# Altium PCB personal_trng_single_sided.PcbDoc
Units mm, origin at the board's own origin, x right, y up, seen from the top; angles counter-clockwise.
Board outline 64 x 84 mm, 2 copper layers (Top Layer, Bottom Layer); 33 components, 38 nets, 138 pads, 0 vias.
Unrouted connection lines stored in the file: 5.
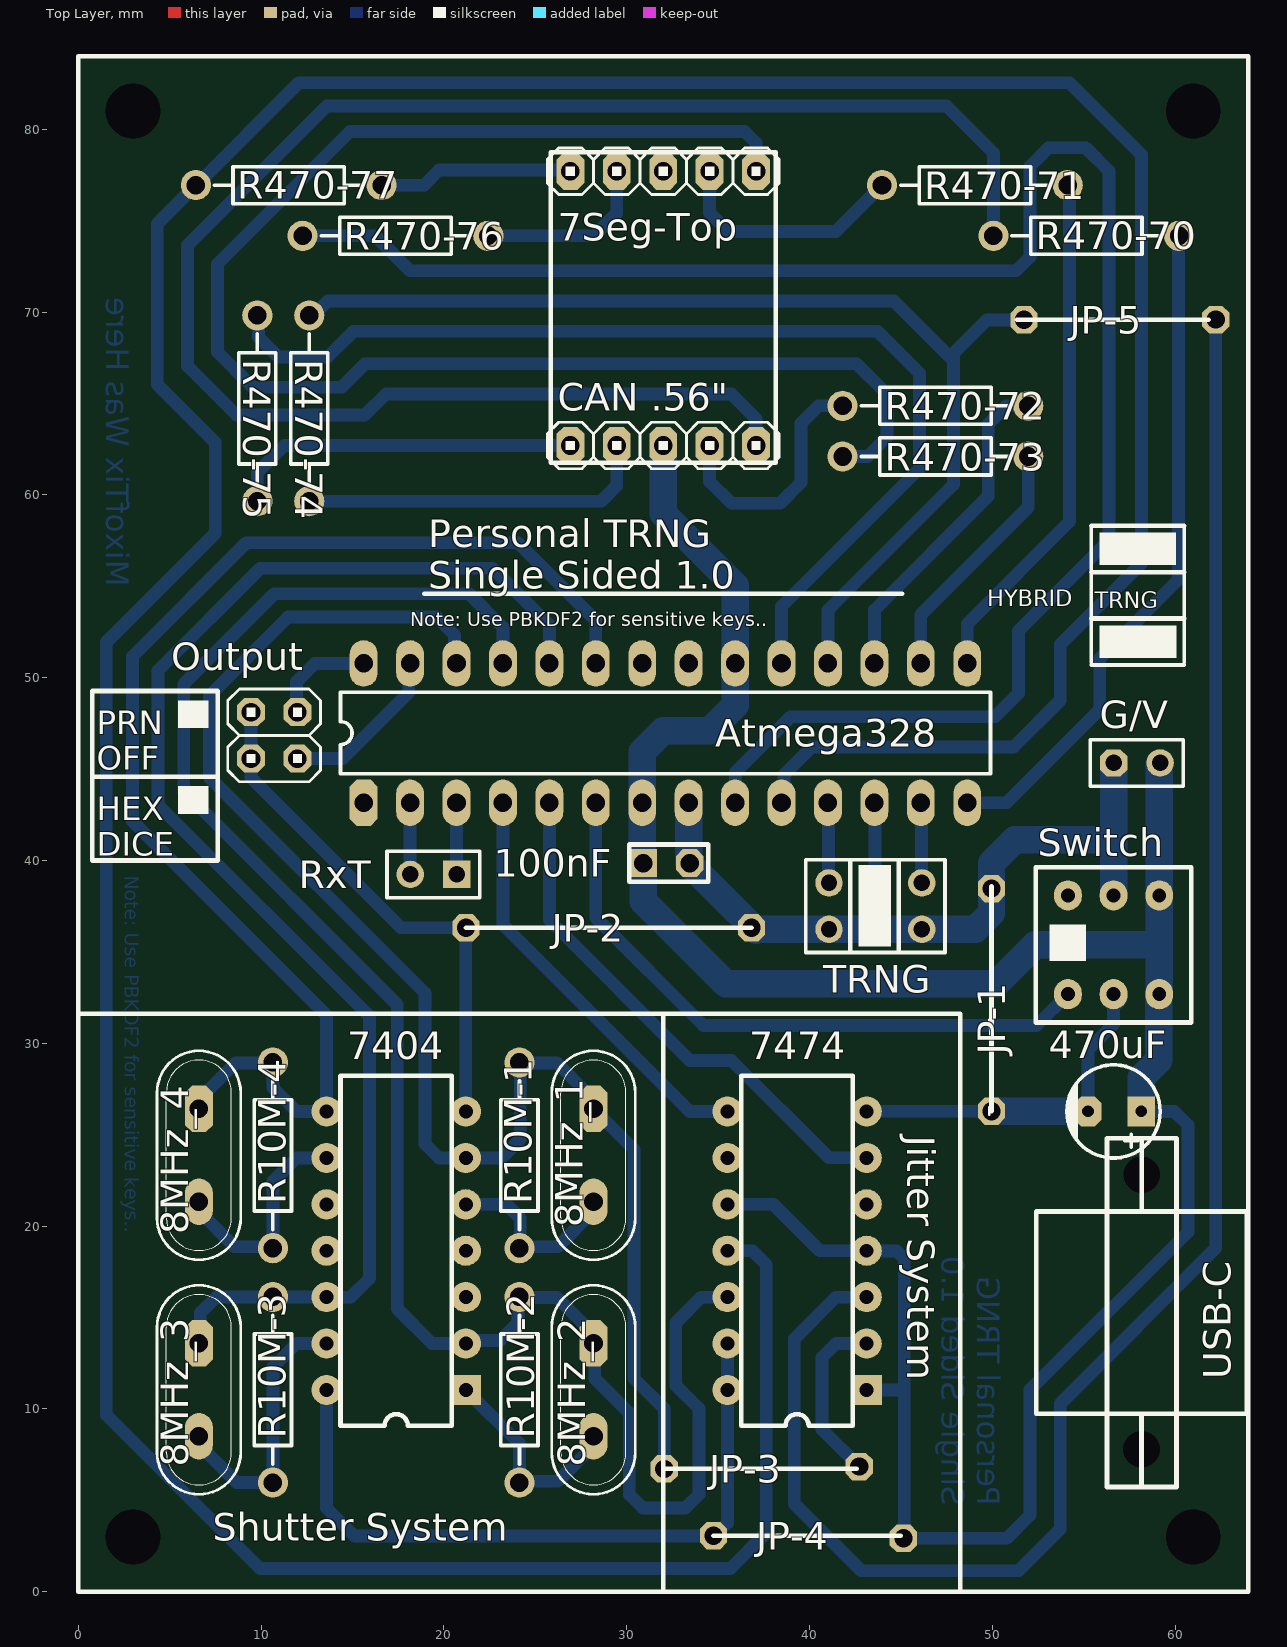
[diagram p0: Top Layer view]
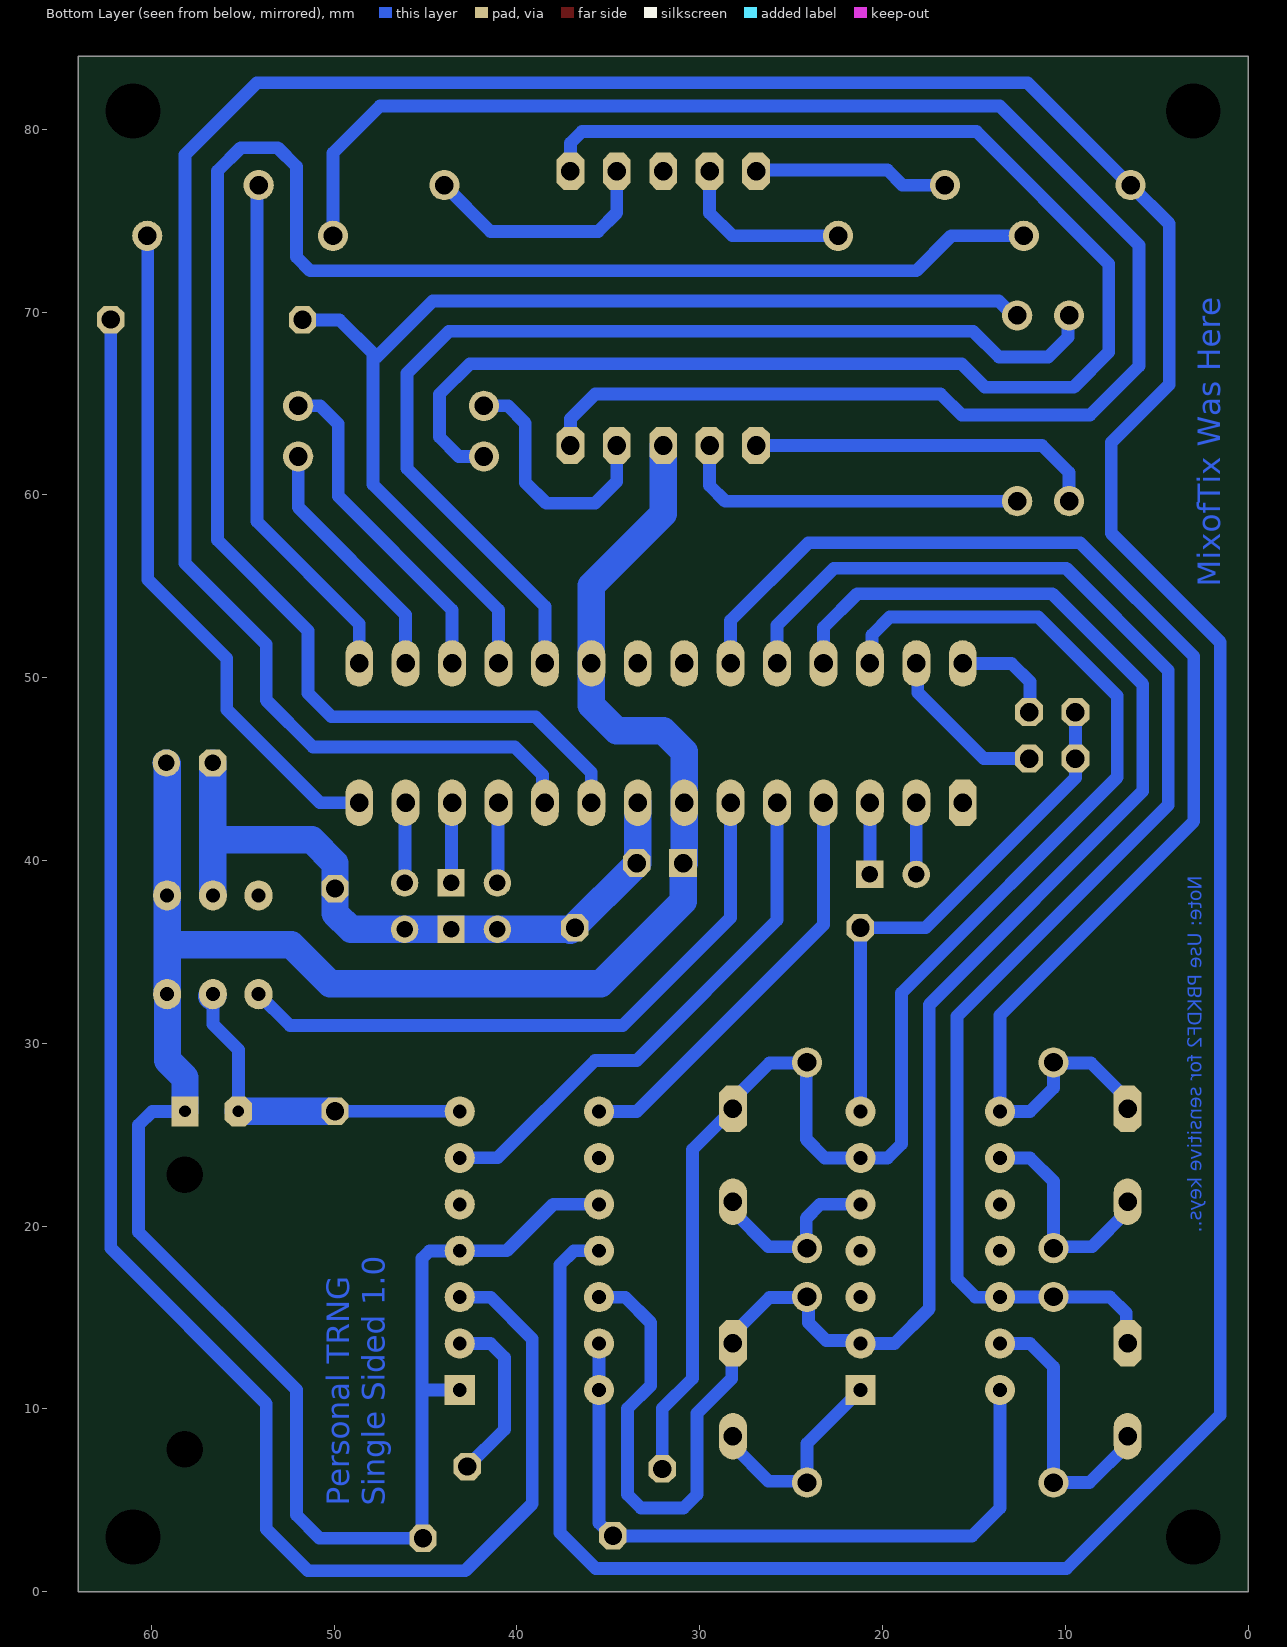
[diagram p1: Bottom Layer view, seen from below]

## Layer stack, top to bottom
Top Solder: solder mask 0.0102, Solder Resist, Dk 3.5
Top Layer: signal copper 0.0356
Dielectric 1: dielectric 0.32, FR-4, Dk 4.8
Bottom Layer: signal copper 0.0356
Bottom Solder: solder mask 0.0102, Solder Resist, Dk 3.5

## Board outline
0,0 64,0 64,84 0,84

## Design rules (kind name [scope] priority, off if disabled: settings)
Clearance [All] p1: gap=0.254 ignorepadtopadclearanceinfootprint=FALSE except(0: Arc-Hole Track-Hole SMDPad-Hole THPad-Hole Via-Hole Fill-Hole Poly-Hole Region-Hole Text-Hole)
PolygonConnect [All] p1: connectstyle=Relief reliefconductorwidth=0.254 reliefentries=4 polygonreliefangle="90 Angle" airgapwidth=0.254
RoutingVias [All] p1: holewidth=0.711 width=1.27 viastyle="Through Hole" minholewidth=0.711 minwidth=1.27 maxholewidth=0.711 maxwidth=1.27
SolderMaskExpansion [All] p1: expansion=0.102 istentingtop=FALSE
Width [All] p1: maxlimit=1.5 minlimit=0.5 preferedwidth=0.7
30 further rules are at their usual default settings.

## Components (designator, comment, footprint, x,y, rotation, side; value= is the part's Value field where it differs from the comment)
7Seg-Top "Header 5" My_1X05 32,77.709 r180 top
8MHz_1 "CRYSTAL" My_Crystal 28.185,23.874 r270 top
8MHz_2 "CRYSTAL" My_Crystal 28.185,11.047 r270 top
8MHz_3 "CRYSTAL" My_Crystal 6.595,11.047 r270 top
8MHz_4 "CRYSTAL" My_Crystal 6.595,23.874 r270 top
100nF "Cap" My_cap100n 32.179,39.863 r180 top value=100nF
470uF "Cap" "cap 01" 56.639,26.274 r0 top
7404 "NOT-Gate" dip14 17.39,18.654 r180 top
7474 "Flip-Flop" dip14 39.323,18.654 r180 top
Atmega328 "ATmega328P" My_28P3 32.122,46.975 r0 top
"CAN .56\"" "Header 5" My_1X05 32,62.709 r180 top
G/V "Header 2" HDR1X2#1 56.642,45.339 r0 top
JP-1 "Jumper" Jumper#1 49.832,28.687 r270 top
JP-2 "Jumper" Jumper#2 29.464,36.322 r180 top
JP-3 "Jumper" Jumper#3 38.021,6.716 r180 top
JP-4 "Jumper" Jumper#4 32.004,3.048 r0 top
JP-5 "Jumper" Jumper#5 57.452,69.581 r180 top
Output "Header 2X2" My_2X02 10.716,46.848 r90 top
R10M-1 "1k" My_axial-0.4 24.146,23.861 r270 top value=Resistor
R10M-2 "1k" My_axial-0.4 24.146,11.034 r270 top value=Resistor
R10M-3 "1k" My_axial-0.4 10.659,11.034 r270 top value=Resistor
R10M-4 "1k" My_axial-0.4 10.659,23.861 r270 top value=Resistor
R470-70 "220" My_axial-0.4 55.16,74.192 r0 top value=Resistor
R470-71 "220" My_axial-0.4 49.064,76.964 r0 top value=Resistor
R470-72 "220" My_axial-0.4 46.905,64.89 r0 top value=Resistor
R470-73 "220" My_axial-0.4 46.905,62.12 r0 top value=Resistor
R470-74 "220" My_axial-0.4 12.621,64.755 r90 top value=Resistor
R470-75 "220" My_axial-0.4 9.781,64.755 r90 top value=Resistor
R470-76 "220" My_axial-0.4 17.339,74.167 r180 top value=Resistor
R470-77 "220" My_axial-0.4 11.497,76.939 r180 top value=Resistor
RxT "Header 2" HDR1X2#2 20.701,39.243 r180 top
Switch "Double Switch" "Switch - DPDT" 56.639,35.389 r90 top
TRNG "Header 3X2" HDR2X3 46.149,38.777 r180 top

## Footprints (in the part's own frame and the unit in brackets; to place one, negate y for a bottom-side part, rotate by r counter-clockwise, add the part's x,y. Pads: shape width x height; smd on the part's side, far side on the other; paste and mask are expansions set on the pad)
"cap 01" [mil]
  rect 59.06x65 hole 25: 1(60,0)
  oct 59.06x65 hole 25: 2(-55,0)
  silkscreen extent -100,-100 100,100, body extent -99,-99 99,99, height 494
dip14 [mil]
  rect 65x65 hole 30: 1(-150,300)
  round 65 hole 30: 2(-150,200) 3(-150,100) 4(-150,0) 5(-150,-100) 6(-150,-200) 7(-150,-300) 8(150,-300) 9(150,-200) 10(150,-100) 11(150,0) 12(150,100) 13(150,200) 14(150,300)
  silkscreen extent -120,-377 120,377, body extent -155,-384 155,384, height 200
HDR1X2#1 [mm] "Connector; Header; 2 Position"
  oct 1.5x1.5 hole 0.9: 1(0,0)
  round 1.5 hole 0.9: 2(2.54,0)
  silkscreen extent -1.27,-1.27 3.81,1.27
HDR1X2#2 [mm] "Connector; Header; 2 Position"
  rect 1.5x1.5 hole 0.9: 1(0,0)
  round 1.5 hole 0.9: 2(2.54,0)
  silkscreen extent -1.27,-1.27 3.81,1.27
HDR2X3 [mm] "Connector; Header; 3x2 Position"
  round 1.5 hole 0.9: 1(0,0) 2(0,2.54) 5(5.08,0) 6(5.08,2.54)
  rect 1.5x1.5 hole 0.9: 3(2.54,0) 4(2.54,2.54)
  silkscreen extent -1.27,-1.27 6.35,3.81
Jumper#1 [mm]
  oct 1.5x1.5 hole 1: 1(-9.779,0.127) 2(2.398,0.127)
  silkscreen extent -2.6,0 2.6,0, body extent -7.26,-1.14 1.16,1.26, height 2.5
Jumper#2 [mm]
  oct 1.5x1.5 hole 1: 1(-7.366,0) 2(8.255,0)
  silkscreen extent -2.6,0 2.6,0, body extent -4.21,-1.2 4.21,1.2, height 2.5
Jumper#3 [mm]
  oct 1.5x1.5 hole 1: 1(-4.699,-0.127) 2(5.969,0)
  body extent -3.53,-1.27 4.89,1.13, height 2.5
Jumper#4 [mm]
  oct 1.5x1.5 hole 1: 1(2.746,0.015) 2(13.138,-0.127)
  body extent 3.79,-1.14 12.21,1.26, height 2.5
Jumper#5 [mm]
  oct 1.5x1.5 hole 1: 1(-4.778,-0.015) 2(5.715,0)
  silkscreen extent -2.6,0 2.6,0, body extent -3.67,-1.15 4.75,1.25, height 2.5
My_1X05 [mil]
  oct 60x80 hole 40: 1(-200,0) 2(-100,0) 3(0,0) 4(100,0) 5(200,0)
  silkscreen extent -250,-50 250,50
My_2X02 [mil]
  oct 60x60 hole 40: 1(-50,-50) 2(-50,50) 3(50,-50) 4(50,50)
  silkscreen extent -100,-100 100,100
My_28P3 [mil]
  oct 60x100 hole 40: 1(-650,-150)
  oval 60x100 hole 40: 2(-550,-150) 3(-450,-150) 4(-350,-150) 5(-250,-150) 6(-150,-150) 7(-50,-150) 8(50,-150) 9(150,-150) 10(250,-150) 11(350,-150) 12(450,-150) 13(550,-150) 14(650,-150) 15(650,150) 16(550,150) 17(450,150) 18(350,150) 19(250,150) 20(150,150) 21(50,150) 22(-50,150) 23(-150,150) 24(-250,150) 25(-350,150) 26(-450,150) 27(-550,150) 28(-650,150)
  silkscreen extent -700,-88 700,88
My_axial-0.4 [mil]
  round 65 hole 40: 1(-200.5,-0.5) 2(199.5,-0.5)
  silkscreen extent -160,-41 160,40
My_cap100n [mil]
  oct 60x60 hole 40: 1(-50,0)
  rect 60x60 hole 40: 2(50,0)
  silkscreen extent -90,-40 80,40
My_Crystal [mil]
  oct 100x60 hole 40: 1(-100,0)
  oval 100x60 hole 40: 2(100,0)
  silkscreen extent -225,-90 225,90
"Switch - DPDT" [mil]
  oval 65x60 hole 30: 1(-106.3,98.43) 2(-106.3,0) 3(-106.3,-98.43) 4(106.3,-98.43) 5(106.3,0) 6(106.3,98.43)
  silkscreen extent -167,-167 167,167, body extent -167,-167 167,167, height 559

## Part data
7Seg-Top "CAN .56\"": "Header, 5-Pin", LatestRevisionDate=17-Jul-2002, LatestRevisionNote="Re-released for DXP Platform.", Publisher="Altium Limited"
8MHz_1 8MHz_2 8MHz_3 8MHz_4: "Crystal"
100nF: library part "Cap ceramic", "CAP-100Nf"
470uF: library part Cap-Polar, "Polar Capacitor", Adding Date=1387/12/20, Designer="Saeid Jorablo", Organazation=ControTec
7404: library part SN7404, "Hex Inverter", Manufactorer="Texas Instrument", Adding Date=1387/12/22, Company=ControTec, ComponentLink1Description="Data Sheet", Designer="Saeid Jorablo"
7474: library part SN7474N, "Dual D Flip Flop", Manufactorer="Texas Instrument", Adding Date=1387/12/22, Company=ControTec, ComponentLink1Description="Data Sheet", Designer="Saeid Jorablo"
Atmega328: library part ATmega8-16PI, "AVR 8K Bytes of In-System Programmable Flash Memory", ComponentLink1Description="Manufacturer Link", ComponentLink1URL=http://www.atmel.com, ComponentLink2Description=Datasheet, ComponentLink2URL=http://www.atmel.com/dyn/resources/prod_documents/doc2486.pdf, DatasheetVersion=2486H-AVR-09/02, LatestRevisionDate=04-Mar-2005, LatestRevisionNote="Stylized 3D Model Added.", PackageDescription="DIP; 28 Leads; Row Spacing 7.62 mm; Pitch 2.54 mm", PackageReference=28P3, PackageVersion="revB, Sep-2001", Published=17-Sep-2003, Publisher="Altium Limited"
G/V RxT: "Header, 2-Pin", LatestRevisionDate=17-Jul-2002, LatestRevisionNote="Re-released for DXP Platform.", Publisher="Altium Limited"
Output: "Header, 2-Pin, Dual row", LatestRevisionDate=17-Jul-2002, LatestRevisionNote="Re-released for DXP Platform.", Publisher="Altium Limited"
R10M-1 R10M-2 R10M-3 R10M-4 R470-70 R470-71 R470-72 R470-73 R470-74 R470-75 R470-76 R470-77: library part Res, "resistor 1/4 wat"
Switch: library part "Switch - DPDT", "DPDT Switch"
TRNG: "Header, 3-Pin, Dual row", LatestRevisionDate=17-Jul-2002, LatestRevisionNote="Re-released for DXP Platform.", Publisher="Altium Limited"
JP-1 JP-2 JP-3 JP-4 JP-5: Company=E.P.I.L, Defualt State=Close, Design Date=2011/11/02

## Free pads (board coordinates)
  round 1.524 hole 3: 3(3,3) 3(3,81) 3(61,3) 3(61,81)
  round 1.524 hole 2: 4(58.166,7.801) 4(58.183,22.801)

## Nets (pads, with @x,y where several pads share a name; then routed paths per layer and width w, separated by ;. In a path a pad name is that pad's centre, name@x,y a point inside that pad or via, vN(x,y) a via of type N, cw(c..) or ccw(c..) an arc to the next point about the centre after c; other vN are vias at no path point)
GND: 100nF.1 470uF.2 7404.7 7474.7 Atmega328.8 G/V.1 JP-1.1 JP-1.2 JP-2.1 JP-2.2 Output.2 Output.4 Switch.2 Switch.5 TRNG.2 TRNG.4 TRNG.6 | length 87.2
  Bottom Layer w0.7: Output.4 Output.2 ; Output.2@9.535,45.489 Output.2 ; 7404.7 JP-2.2@21.2,36.322 ; JP-2.2 JP-2.2@21.2,36.322 ; JP-2.1@37.075,36.185 JP-2.1@37.127,36.237 ; 7474.7 43.14,26.281 49.951,26.281 JP-1.2 ; 470uF.2@55.293,26.325 470uF.2 55.242,26.289 55.242,29.652 56.639,31.049 Switch.2 Switch.2@56.69,32.638 ; Output.2 9.446,44.529 17.653,36.322 JP-2.2@21.2,36.322
  Bottom Layer w1.5: Atmega328.8 33.397,43.16 33.397,39.863 JP-2.1@37.075,36.185 ; JP-2.1@37.127,36.237 TRNG.6 TRNG.4 TRNG.2 49.08,36.237 49.959,37.116 JP-1.1 49.959,39.863 51.229,41.133 56.639,41.133 ; JP-1.2 470uF.2@55.242,26.289 ; Switch.5 56.639,41.133 ; G/V.1@56.639,45.339 56.639,41.133 ; 56.642,41.133 56.639,41.133 ; Switch.2@56.644,32.632 56.644,32.614 Switch.2@56.69,32.568
Net7Seg-Top_1: 7Seg-Top.1 R470-73.1 | length 83
  Bottom Layer w0.7: 7Seg-Top.1 37.08,79.252 36.449,79.883 14.859,79.883 7.62,72.644 7.62,67.818 9.54,65.898 14.399,65.898 15.684,67.183 42.578,67.183 44.244,65.517 44.244,63.167 43.185,62.108 R470-73.1 ; 7Seg-Top.1@37.172,77.739 7Seg-Top.1@37.202,77.709
Net7Seg-Top_2: 7Seg-Top.2 R470-71.1 | length 13.2
  Bottom Layer w0.7: 7Seg-Top.2 34.54,75.442 35.56,74.422 41.442,74.422 R470-71.1 ; 7Seg-Top.2@34.662,77.709 7Seg-Top.2@34.716,77.655
Net7Seg-Top_4: 7Seg-Top.4 R470-76.1 | length 9.8
  Bottom Layer w0.7: R470-76.1 28.206,74.18 29.46,75.434 7Seg-Top.4
Net7Seg-Top_5: 7Seg-Top.5 R470-77.1 | length 10.8
  Bottom Layer w0.7: R470-77.1 18.912,76.951 19.736,77.775 26.877,77.775 7Seg-Top.5@26.927,77.824 ; 7Seg-Top.5@26.976,77.775 7Seg-Top.5@27.042,77.709
Net8MHz_1_1: 8MHz_1.1 7404.6 Atmega328.26 JP-3.2 R10M-1.1 | length 83
  Bottom Layer w0.7: Atmega328.26 20.584,50.893 20.584,52.347 19.606,53.325 11.478,53.325 7.16,49.007 7.16,44.562 18.971,32.751 18.971,24.496 19.733,23.734 7404.6 ; 7404.6@21.145,23.789 7404.6 ; R10M-1.1 R10M-1.1@24.166,28.922 ; 8MHz_1.1 30.401,24.198 30.401,11.669 32.052,10.018 JP-3.2 ; 8MHz_1.1@28.185,26.922 26.185,28.922 R10M-1.1@24.166,28.922 ; 7404.6 23.162,23.734 24.178,24.75 24.178,28.909 R10M-1.1@24.166,28.922
Net8MHz_1_2: 8MHz_1.2 7404.5 R10M-1.2 | length 10.3
  Bottom Layer w0.7: 7404.5 23.416,21.194 24.178,20.432 R10M-1.2@24.178,18.838 ; R10M-1.2 R10M-1.2@24.178,18.838 ; 8MHz_1.2 28.185,20.826 26.232,18.873 24.213,18.873 R10M-1.2@24.178,18.838
Net8MHz_2_1: 8MHz_2.1 7404.2 7474.12 Atmega328.25 R10M-2.1 | length 102.8
  Bottom Layer w0.7: Atmega328.25 23.232,52.747 21.384,54.595 10.716,54.595 5.763,49.642 5.763,43.8 17.447,32.116 17.447,15.479 19.352,13.574 7404.2 21.368,13.741 23.076,13.741 24.051,14.717 24.051,16.044 R10M-2.1 24.166,16.095 26.185,16.095 28.185,14.095 8MHz_2.1 28.25,13.522 28.25,11.661 30.147,9.764 30.147,5.319 30.894,4.572 33.21,4.572 33.957,5.319 33.957,10.018 32.687,11.288 32.687,14.717 34.084,16.114 7474.12
Net8MHz_2_2: 8MHz_2.2 7404.1 R10M-2.2 | length 11.7
  Bottom Layer w0.7: 7404.1 24.134,8.1 R10M-2.2 24.213,6.046 26.232,6.046 28.185,7.999 8MHz_2.2
Net8MHz_3_1: 8MHz_3.1 7404.12 Atmega328.24 R10M-3.1 | length 76.9
  Bottom Layer w0.7: 8MHz_3.1 6.672,13.664 6.672,15.245 7.554,16.127 R10M-3.1 10.653,16.12 13.574,16.12 7404.12 14.907,16.114 15.923,17.13 15.923,31.481 4.366,43.038 4.366,50.404 9.954,55.992 22.654,55.992 25.772,52.874 Atmega328.24
Net8MHz_3_2: 8MHz_3.2 7404.13 R10M-3.2 | length 15.2
  Bottom Layer w0.7: 8MHz_3.2 6.595,8.043 8.671,5.967 R10M-3.2 10.646,12.291 11.929,13.574 7404.13
Net8MHz_4_1: 8MHz_4.1 7404.8 Atmega328.23 R10M-4.1 | length 71.6
  Bottom Layer w0.7: 8MHz_4.1 6.595,26.922 8.595,28.922 10.614,28.922 R10M-4.1 10.646,27.557 11.929,26.274 7404.8 13.58,31.538 2.969,42.149 2.969,51.166 9.192,57.389 24.051,57.389 28.312,53.128 Atmega328.23
Net8MHz_4_2: 8MHz_4.2 7404.9 R10M-4.2 | length 12.5
  Bottom Layer w0.7: 8MHz_4.2 6.595,20.826 8.548,18.873 10.567,18.873 R10M-4.2 10.646,22.451 11.929,23.734 7404.9
Net7474_2: 7474.2 JP-3.1 | length 9.6
  Bottom Layer w0.7: JP-3.1 40.688,8.875 40.688,12.812 41.45,13.574 7474.2
Net7474_3: 7474.3 JP-5.1 | length 100.6
  Bottom Layer w0.7: 7474.3 41.45,16.114 39.164,13.828 39.164,4.811 42.832,1.143 51.435,1.143 53.721,3.429 53.721,10.287 62.23,18.796 JP-5.1
Net7474_6: 7474.6 Atmega328.5 | length 29.2
  Bottom Layer w0.7: Atmega328.5 25.772,36.745 33.449,29.068 35.735,29.068 41.066,23.737 7474.6@43.168,23.737
Net7474_8: 7474.8 Atmega328.4 | length 23.2
  Bottom Layer w0.7: Atmega328.4 23.232,36.491 33.449,26.274 7474.8
Net7474_11: 7474.11 Atmega328.10 R470-77.2 | length 235.2
  Bottom Layer w0.7: 1.524,9.652 1.524,51.943 7.493,57.912 7.493,62.865 4.318,66.04 4.318,74.839 R470-77.2 ; 1.572,9.637 9.939,1.27 35.687,1.27 37.64,3.223 37.64,17.892 36.878,18.654 7474.11 ; R470-77.2@6.448,76.933 12.065,82.55 54.229,82.55 58.166,78.613 58.166,56.261 53.721,51.816 53.721,48.768 51.166,46.213 40.123,46.213 38.609,44.699 38.609,43.302 Atmega328.10
NetAtmega328_2: Atmega328.2 RxT.2 | length 4.1
  Bottom Layer w0.7: Atmega328.2@17.994,43.007 Atmega328.2 RxT.2@18.152,39.243
NetAtmega328_3: Atmega328.3 RxT.1 | length 4
  Bottom Layer w0.7: RxT.1@20.692,39.243 Atmega328.3 Atmega328.3@20.765,43.092
NetAtmega328_6: Atmega328.6 Switch.1 Switch.6 | length 35.3
  Bottom Layer w0.7: Atmega328.6 28.312,36.872 34.211,30.973 52.423,30.973 Switch.1
NetAtmega328_9: Atmega328.9 R470-76.2 | length 100.7
  Bottom Layer w0.7: R470-76.2 16.244,74.18 18.161,72.263 51.308,72.263 52.07,73.025 52.07,77.978 53.086,78.994 55.118,78.994 56.388,77.724 56.388,57.531 51.435,52.578 51.435,49.149 50.15,47.864 38.98,47.864 35.942,44.826 35.942,43.175 Atmega328.9
NetAtmega328_11: Atmega328.11 TRNG.5 | length 4.4
  Bottom Layer w0.7: Atmega328.11 41.04,43.136 41.04,38.806 TRNG.5
NetAtmega328_12: Atmega328.12 TRNG.3 | length 4.4
  Bottom Layer w0.7: Atmega328.12 43.59,43.127 TRNG.3@43.59,38.777
NetAtmega328_13: Atmega328.13 TRNG.1 | length 4.4
  Bottom Layer w0.7: Atmega328.13 46.13,43.127 TRNG.1@46.13,38.777
NetAtmega328_14: Atmega328.14 R470-70.2 | length 37.1
  Bottom Layer w0.7: Atmega328.14 50.785,43.165 55.88,48.26 55.88,51.054 60.198,55.372 R470-70.2@60.198,74.18
NetAtmega328_15: Atmega328.15 R470-71.2 | length 28.6
  Bottom Layer w0.7: Atmega328.15 48.632,52.95 54.229,58.547 R470-71.2@54.229,77.089
NetAtmega328_16: Atmega328.16 R470-73.2 | length 13.8
  Bottom Layer w0.7: Atmega328.16 46.092,53.452 51.972,59.332 R470-73.2
NetAtmega328_17: Atmega328.17 R470-72.2 | length 18.3
  Bottom Layer w0.7: Atmega328.17 43.552,53.706 49.784,59.938 49.784,63.881 50.781,64.878 R470-72.2
NetAtmega328_18: Atmega328.18 JP-5.2 R470-74.2 | length 61.4
  Bottom Layer w0.7: R470-74.2 12.857,69.822 13.646,70.612 44.61,70.612 47.673,67.549 47.879,67.755 ; Atmega328.18 41.012,53.706 47.879,60.573 47.879,67.755 ; JP-5.2 49.705,69.581 47.879,67.755
NetAtmega328_19: Atmega328.19 R470-75.2 | length 58.4
  Bottom Layer w0.7: R470-75.2 9.855,69.761 9.855,68.631 10.937,67.549 13.637,67.549 15.049,68.961 43.721,68.961 46.022,66.66 46.022,61.453 38.472,53.903 Atmega328.19
NetAtmega328_27: Atmega328.27 Output.1 | length 9.2
  Bottom Layer w0.7: Output.1 14.463,45.578 18.076,49.191 18.076,50.709 Atmega328.27
NetAtmega328_28: Atmega328.28 Output.3 | length 5.8
  Bottom Layer w0.7: Output.3 11.938,48.166 11.938,49.784 12.939,50.785 Atmega328.28
"NetCAN .56\"_1": "CAN .56\".1" R470-70.1 | length 94.3
  Bottom Layer w0.7: 37.08,62.709 37.08,64.172 35.72,65.532 16.827,65.532 15.669,64.374 8.651,64.374 5.969,67.056 5.969,73.66 13.589,81.28 47.498,81.28 50.067,78.711 R470-70.1 ; 37.132,62.779 37.202,62.709
"NetCAN .56\"_2": "CAN .56\".2" R470-72.1 | length 13.8
  Bottom Layer w0.7: 34.54,62.709 34.54,60.743 35.735,59.548 38.402,59.548 39.545,60.691 39.545,63.929 40.494,64.878 R470-72.1
"NetCAN .56\"_4": "CAN .56\".4" R470-74.1 | length 19.4
  Bottom Layer w0.7: R470-74.1 28.61,59.662 29.46,60.512 29.46,62.709
"NetCAN .56\"_5": "CAN .56\".5" R470-75.1 | length 19.3
  Bottom Layer w0.7: R470-75.1 9.794,61.229 11.274,62.709 26.92,62.709
VCC: 7Seg-Top.3 100nF.2 470uF.1 7404.14 7474.1 7474.4 7474.10 7474.13 7474.14 "CAN .56\".3" Atmega328.7 Atmega328.20 G/V.2 JP-4.1 JP-4.2 Switch.3 Switch.4 | length 183.3
  Bottom Layer w0.7: 7404.14 13.58,4.581 15.113,3.048 34.798,3.048 35.513,3.763 7474.14 7474.13 ; 7474.10 38.021,21.194 40.561,18.654 7474.4 43.14,18.647 44.78,18.647 45.19,18.237 45.19,11.034 ; 7474.1@43.36,11.261 7474.1 45.19,11.034 ; JP-4.2 JP-4.2@45.19,2.921 ; 470uF.1@58.189,26.248 470uF.1 59.959,26.274 60.706,25.527 60.706,19.685 52.07,11.049 52.07,4.191 50.8,2.921 JP-4.2@45.19,2.921 ; Switch.3@59.103,32.653 59.121,32.671 Switch.3 ; JP-4.2@45.19,2.921 45.19,11.034
  Bottom Layer w1.5: 100nF.2@30.852,39.863 Atmega328.7 30.852,45.959 31.995,47.102 34.535,47.102 35.932,48.499 Atmega328.20 35.932,55.033 32,58.965 32,62.709 ; 100nF.2@30.909,39.482 30.909,37.774 35.424,33.259 50.213,33.259 52.343,35.389 59.139,35.389 ; 470uF.1 58.163,28.128 59.121,29.086 Switch.3@59.121,32.671 ; Switch.3 59.139,35.389 ; G/V.2 59.139,45.296 Switch.4 59.139,35.389
pads on no net: 7404.3 7404.4 7404.10 7404.11 7474.5 7474.9 Atmega328.1 Atmega328.21 Atmega328.22

## Other copper
Bottom Layer:
  text "MixofTix Was Here" at 1.524,54.991 h1.24 r270
  text "Note: Use PBKDF2 for sensitive keys.." at 2.54,39.179 h0.75 r270
  text "Single Sided 1.0" at 47.228,4.714 h1.24 r270
  text "Personal TRNG" at 49.188,4.714 h1.24 r270

## Silkscreen, mask and mechanical layers (free items; w line width, h text height)
Top Overlay:
  rectangle: 55.872,56.16 60.063,57.938
  rectangle: 55.882,51.086 60.073,52.864
  rectangle: 5.461,42.545 7.112,44.069
  rectangle: 5.461,47.244 7.112,48.768
  region: 44.45,35.306 44.45,39.751 42.672,39.751 42.672,35.306
  lines w0.2: 55.414,50.699 60.514,50.699 ; 55.414,50.826 55.414,58.319 ; 60.514,50.826 60.514,58.319
  lines w0.254: 0,31.623 48.26,31.623 48.26,0 ; 0.762,44.577 7.62,44.577 ; 18.919,54.595 45.081,54.595 ; 21.209,36.322 36.83,36.322 ; 25.838,61.757 25.838,78.756 ; 25.905,61.757 38.095,61.757 ; 25.905,78.756 38.095,78.756 ; 32.004,0.004 32.004,31.623 ; 32.052,6.716 42.593,6.716 ; 34.75,3.063 45,3.063 ; 38.155,61.757 38.155,78.756 ; 42.233,35.064 42.233,39.92 ; 44.879,35.037 44.879,39.99 ; 49.959,26.289 49.959,38.593 ; 51.356,69.581 61.834,69.581 ; 55.434,53.239 60.494,53.239 ; 55.434,55.779 60.494,55.779 ; 55.434,58.319 60.494,58.319 ; 60.079,5.731 58.166,5.731 ; 60.083,5.727 60.083,24.801 58.183,24.801 ; 58.166,5.731 56.283,5.731 56.283,24.801 58.183,24.801 ; 58.166,5.731 58.166,7.731 58.166,9.731 ; 58.166,9.731 52.416,9.731 52.416,20.801 58.183,20.801 ; 58.166,9.731 63.931,9.731 63.931,20.801 58.183,20.801 ; 58.183,20.801 58.183,22.801 58.183,24.801 ; 0,0 0,84 64,84 64,0 0,0 ; 0.762,40.005 7.62,40.005 7.62,49.276 0.762,49.276 0.762,40.005
  text "Personal TRNG / Single Sided 1.0" at 19.133,54.864 h1.52
  text "HYBRID" at 49.73,53.921 h0.9
  text "TRNG" at 55.611,53.8 h0.9
  text "Note: Use PBKDF2 for sensitive keys.." at 18.157,52.817 h0.75
  text "PRN / OFF" at 1.016,44.958 h1.3
  text "HEX / DICE" at 1.016,40.259 h1.3
  text "Jitter System" at 45.339,24.953 h1.52 r270
  text "USB-C" at 63.04,11.612 h1.52 r90
  text "Shutter System" at 7.36,2.794 h1.52
Mechanical 1:
  circle w0.254: c61,81 r2.5
  circle w0.254: c61,3 r2.5
  circle w0.254: c3,81 r2.5
  circle w0.254: c3,3 r2.5
  lines w0.254: 15.612,45.451 15.612,78.852 ; 18.152,5.573 18.152,54.214 ; 20.692,45.451 20.692,78.979 ; 23.232,45.451 23.232,78.979 ; 31.868,60.691 32.104,60.691 ; 32,33.401 32,87.488 ; 41.012,45.451 41.012,78.852 ; 43.552,45.451 43.552,78.725 ; 46.092,1.001 46.092,54.214 ; 48.632,45.451 48.632,78.217 ; 0,0 64,0 64,84 0,84 0,0

## Dimensions
52.416,20.801 to 63.931,20.801 on Mechanical 1
46.092,1.001 to 61.642,6.334 on Mechanical 1
32,33.401 to 64,84 on Mechanical 1
61,3 to 64,0 on Mechanical 1
61,3 to 64,0 on Mechanical 1
3,3 to 0,0 on Mechanical 1
61,81 to 64,84 on Mechanical 1
58.166,7.801 to 58.183,22.801 on Mechanical 1
0,84 to 32,33.401 on Mechanical 1
48.632,78.217 to 64,84 on Mechanical 1
0,84 to 0,0 on Mechanical 1
26.92,62.709 to 20.692,78.979 on Mechanical 1
37.08,62.709 to 43.552,78.725 on Mechanical 1
0,84 to 64,84 on Mechanical 1
26.92,77.709 to 26.92,62.709 on Mechanical 1